# Altium PCB AI_Watch_PCB.PcbDoc (part 2 of 3)
Units mm, origin at the board's own origin, x right, y up, seen from the top; angles counter-clockwise.
Board outline 25 x 31 mm, 4 copper layers (Top Layer, Ground, Power, Bottom Layer), stack 1.586 mm thick; 87 components, 63 nets, 302 pads, 164 vias.
Unrouted connection lines stored in the file: 13.
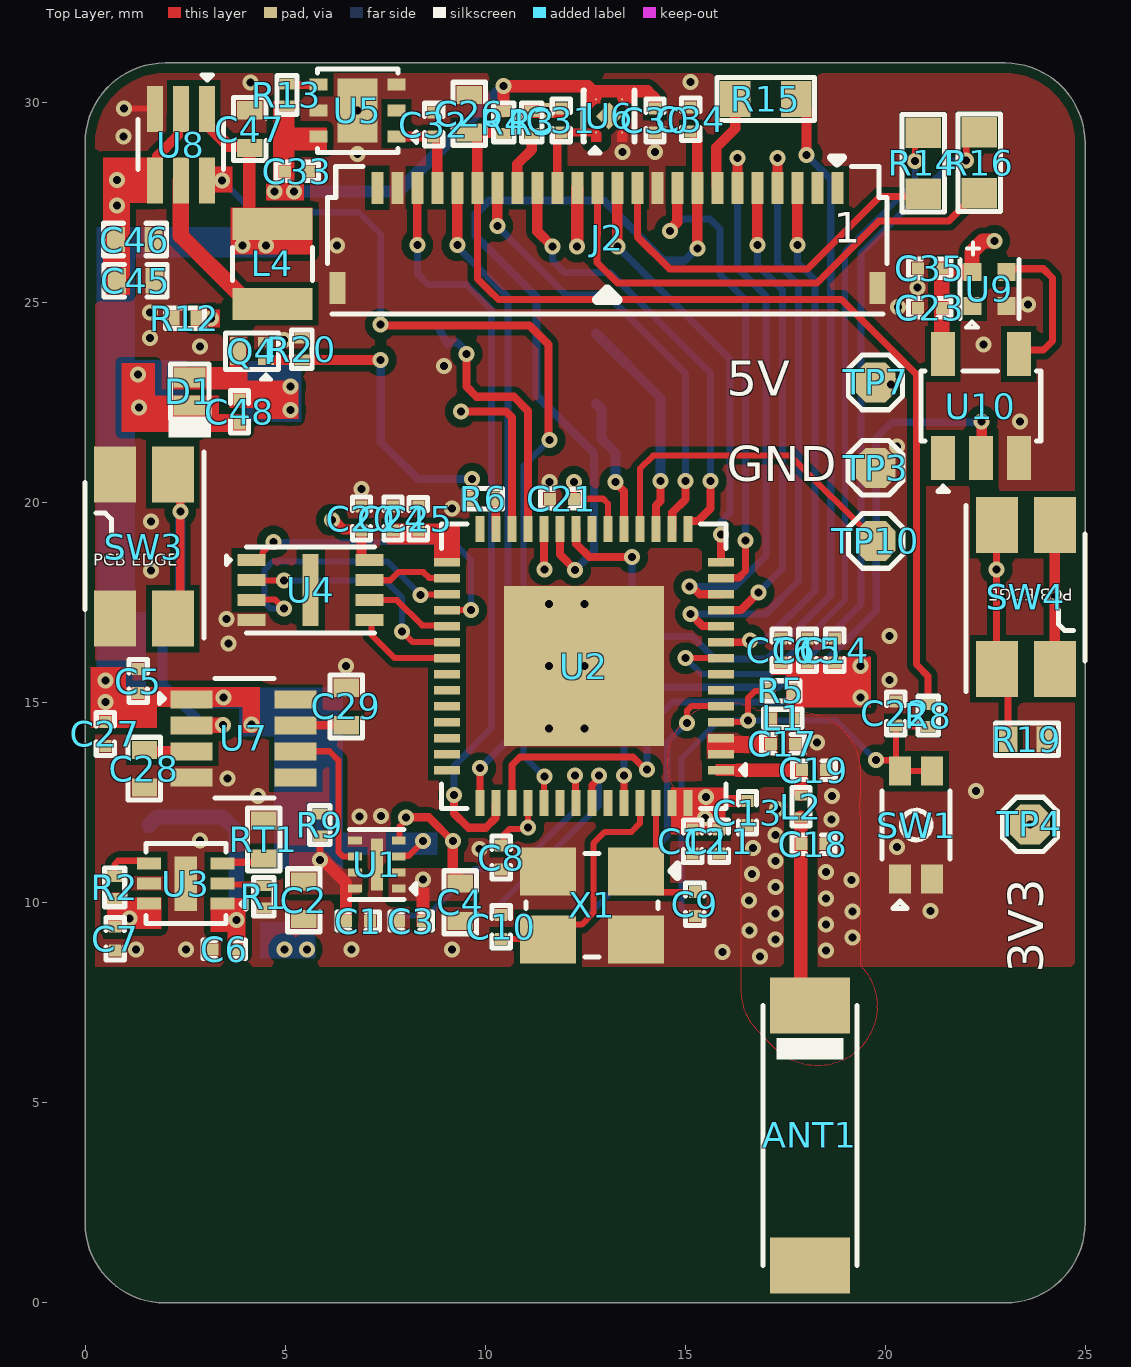
[diagram p0: Top Layer view]

## Part data (continued)
SW3 SW4: "SWITCH TACTILE SPST-NO 0.05A 12V", Actuator Color=Black, Case/Package=SMD/SMT, Contact Current Rating=50mA, Contact Resistance=500mR, LCSC Part Number=C79167, Manufacturer=Panasonic, Max Operating Temperature=70°C, Max Voltage Rating (DC)=12V, Min Operating Temperature=-20°C, Operating Force=2.2N, Package Quantity=5000, Supplier Part Number=667-EVQP7A01P, Actuator Length=0.65mm, Category="Tactile Switches", ComponentLink1Description=http://uk.rs-online.com/webdocs/13a5/0900766b813a5dbe.pdf?src-supplier=Rs, ComponentLink1URL=http://uk.rs-online.com/webdocs/13a5/0900766b813a5dbe.pdf?src-supplier=Rs, ComponentLink2Description=http://datasheet.octopart.com/EVQ-P7A01P-Panasonic-datasheet-98950114.pdf?src-supplier=Rs, ComponentLink2URL=http://datasheet.octopart.com/EVQ-P7A01P-Panasonic-datasheet-98950114.pdf?src-supplier=Rs, ComponentLink3Description=https://www3.panasonic.biz/ac/e_download/control/switch/light-touch/catalog/sw_lt_eng_3529s_side.pdf?src-supplier=Verical, ComponentLink3URL=https://www3.panasonic.biz/ac/e_download/control/switch/light-touch/catalog/sw_lt_eng_3529s_side.pdf?src-supplier=Verical, ComponentLink4Description=https://www3.panasonic.biz/ac/e_download/control/switch/light-touch/catalog/sw_lt_eng_3529s_side.pdf?src-supplier=Onlinecomponents.com, ComponentLink4URL=https://www3.panasonic.biz/ac/e_download/control/switch/light-touch/catalog/sw_lt_eng_3529s_side.pdf?src-supplier=Onlinecomponents.com, ComponentLink5Description=https://www3.panasonic.biz/ac/e_download/control/switch/light-touch/catalog/sw_lt_eng_3529s_side.pdf?src-supplier=Arrow+Electronics, ComponentLink5URL=https://www3.panasonic.biz/ac/e_download/control/switch/light-touch/catalog/sw_lt_eng_3529s_side.pdf?src-supplier=Arrow+Electronics, ComponentLink6Description=https://www3.panasonic.biz/ac/e_download/control/switch/light-touch/catalog/sw_lt_eng_3529s_side.pdf?src-supplier=Avnet, ComponentLink6URL=https://www3.panasonic.biz/ac/e_download/control/switch/light-touch/catalog/sw_lt_eng_3529s_side.pdf?src-supplier=Avnet, ComponentLink7Description=http://www.farnell.com/datasheets/1790605.pdf?src-supplier=Newark, ComponentLink7URL=http://www.farnell.com/datasheets/1790605.pdf?src-supplier=Newark, ComponentLink8Description=https://datasheet.octopart.com/EVQ-P7A01P-Panasonic-datasheet-98950114.pdf?src-supplier=Future+Electronics, ComponentLink8URL=https://datasheet.octopart.com/EVQ-P7A01P-Panasonic-datasheet-98950114.pdf?src-supplier=Future+Electronics, ComponentLink9Description=https://www3.panasonic.biz/ac/e_download/control/switch/light-touch/catalog/sw_lt_eng_3529s_side.pdf?src-supplier=Mouser, ComponentLink9URL=https://www3.panasonic.biz/ac/e_download/control/switch/light-touch/catalog/sw_lt_eng_3529s_side.pdf?src-supplier=Mouser, ComponentLink10Description=https://www3.panasonic.biz/ac/e_download/control/switch/light-touch/catalog/sw_lt_eng_3529s_side.pdf?src-supplier=Allied+Electronics, ComponentLink10URL=https://www3.panasonic.biz/ac/e_download/control/switch/light-touch/catalog/sw_lt_eng_3529s_side.pdf?src-supplier=Allied+Electronics, ComponentLink11Description=http://datasheet.octopart.com/EVQ-P7A01P-Panasonic-datasheet-98950114.pdf?src-supplier=Future+Electronics, ComponentLink11URL=http://datasheet.octopart.com/EVQ-P7A01P-Panasonic-datasheet-98950114.pdf?src-supplier=Future+Electronics, ComponentLink12Description=http://datasheet.octopart.com/EVQ-P7A01P-Panasonic-datasheet-98950114.pdf?src-supplier=Distrelec, ComponentLink12URL=http://datasheet.octopart.com/EVQ-P7A01P-Panasonic-datasheet-98950114.pdf?src-supplier=Distrelec, ComponentLink13Description=http://datasheet.octopart.com/EVQ-P7A01P-Panasonic-datasheet-98950114.pdf?src-supplier=Farnell, ComponentLink13URL=http://datasheet.octopart.com/EVQ-P7A01P-Panasonic-datasheet-98950114.pdf?src-supplier=Farnell, ComponentLink14Description=http://www.farnell.com/datasheets/1790605.pdf?src-supplier=Element14, ComponentLink14URL=http://www.farnell.com/datasheets/1790605.pdf?src-supplier=Element14, ComponentLink15Description=http://industrial.panasonic.com/www-data/pdf/ATK0000/ATK0000CE20.pdf?src-supplier=Farnell, ComponentLink15URL=http://industrial.panasonic.com/www-data/pdf/ATK0000/ATK0000CE20.pdf?src-supplier=Farnell, ComponentLink16Description=http://datasheet.octopart.com/EVQ-P7A01P-Panasonic-datasheet-98950114.pdf?src-supplier=Newark, ComponentLink16URL=http://datasheet.octopart.com/EVQ-P7A01P-Panasonic-datasheet-98950114.pdf?src-supplier=Newark, ComponentLink17Description=https://datasheet.octopart.com/EVQ-P7A01P-Panasonic-datasheet-22087671.pdf?src-supplier=Electro+Sonic, ComponentLink17URL=https://datasheet.octopart.com/EVQ-P7A01P-Panasonic-datasheet-22087671.pdf?src-supplier=Electro+Sonic, ComponentLink18Description=http://datasheet.octopart.com/EVQ-P7A01P-Panasonic-datasheet-98950114.pdf?src-supplier=Quest, ComponentLink18URL=http://datasheet.octopart.com/EVQ-P7A01P-Panasonic-datasheet-98950114.pdf?src-supplier=Quest, ComponentLink19Description=https://www3.panasonic.biz/ac/e_download/control/switch/light-touch/catalog/sw_lt_eng_3529s_side.pdf?src-supplier=TTI, ComponentLink19URL=https://www3.panasonic.biz/ac/e_download/control/switch/light-touch/catalog/sw_lt_eng_3529s_side.pdf?src-supplier=TTI, ComponentLink20Description=https://www3.panasonic.biz/ac/e_download/control/switch/light-touch/catalog/sw_lt_eng_3529s_side.pdf?src-supplier=NAC+Semi, ComponentLink20URL=https://www3.panasonic.biz/ac/e_download/control/switch/light-touch/catalog/sw_lt_eng_3529s_side.pdf?src-supplier=NAC+Semi, Electrical Life=100000Cycles, Illumination Type=Non-Illuminated, Item Type="Tactile Switch", Lead Free="Lead Free", Manufacturer Part Number=EVQ-P7A01P, Mechanical Life=100000Cycles, Mounting Technology="Surface Mount", Orientation="Right Angle", Packaging="Tape and Reel", Pricing="1=0.28, 10=0.258, 50=0.258, 100=0.213, 1000=0.169, 10000=0.133 (USD)", Radiation Hardening=No, Reach SVHC Compliant=Unknown, RoHS=Yes, Series=EVQP7, Stock=47904, Supplier=Mouser, Switch Function=Off-Mom, Switch Travel=0.2mm, Termination="Gull Wing", Throw Configuration=SPST
TP1 TP2 TP5 TP6: "Wire Connecting Pad", Item Type="Test Point", Manufacturer Part Number="2 Test Pad"
TP3 TP4 TP7 TP9 TP10 TP11: "Test Point ON", Item Type="Test Point", Manufacturer Part Number="TEST POINT 0.5mm Dia"
U1: "IC REG LINEAR 3.3V 1A 8DFN", Case/Package=DFN, LCSC Part Number=C2969937, Manufacturer=STMicroelectronics, Max Operating Temperature=85°C, Max Supply Voltage=5.5V, Min Operating Temperature=-40°C, Min Output Voltage=3.3V, Output Current=1A, Power Supply Rejection Ratio (PSRR)=55dB, Quiescent Current=155uA, ComponentLink1Description=https://www.st.com/resource/en/datasheet/ld56100.pdf?src-supplier=Digikey, ComponentLink1URL=https://www.st.com/resource/en/datasheet/ld56100.pdf?src-supplier=Digikey, Item Type=IC, Manufacturer Part Number=LD56100DPU33R, Mounting Technology="Surface Mount", Number of Regulators=1, Output Configuration=Positive, Output Type=Fixed, Packaging="Cut Tape", Pricing="1=1.23, 10=0.751, 50=0.751, 100=0.479, 1000=0.326, 10000=0.229 (USD)", RoHS=Yes, RoHS Compliant=Yes, Series=-, Supplier=Mouser
U2: "SMD IC ESP32-S3R8, DUAL-CORE MCU", Manufacturer="Espressif Systems", Supplier Part Number 1=356-ESP32-S3R8, Category="RF Receivers, Transceivers", Item Type=IC, Manufacturer Part Number=ESP32-S3R8, Pricing 1="1=2.46, 10=2.46, 50=2.46, 100=2.46, 1000=2.46, 10000=2.46 (USD)", RoHS=No, Stock 1=2366, Supplier 1=Mouser
U3: "500Ma Usb Compatible Single Cell Li-Ion Linear Charger With Float Voltage Of 4.2V / Reel", Battery Pack Voltage=4.5V, Case/Package=DFN, LCSC Part Number=C890816, Manufacturer="ON Semiconductor", Max Charge Current=500mA, Max Operating Temperature=85°C, Max Supply Voltage=6V, Min Operating Temperature=-30°C, ComponentLink1Description=LCSC, ComponentLink1URL=https://www.lcsc.com/product-detail/Battery-Management-ICs_onsemi-FAN54120MP420X_C890816.html, Fault Protection="Over Current,Over Voltage,Short Circuit", Interface=USB, Item Type=IC, Manufacturer Part Number=FAN54120MP420X, Mounting Technology="Surface Mount", Number of Cells=1, Pricing="3000=0.9606, 6000=0.9252, 12000=0.8029, 15000=0.7598, 24000=0.7093, 30000=0.6852 (USD)", RoHS=Yes, RoHS Compliant=Yes, Series=-, Stock=3000, Supplier="Arrow Electronics", Supplier Part Number=FAN54120MP420X
U4: "IC FLASH 16MBIT SPI/QUAD 8USON", LCSC Part Number=C2986331, Manufacturer=GigaDevice, Item Type=IC, Manufacturer Part Number=GD25Q16EEIGR, Pricing="1=0.84, 10=0.75, 25=0.7152, 50=0.69, 100=0.6658, 250=0.63504, 500=0.61266, 1000=0.59108 (USD)", RoHS=No, Stock=2468, Supplier=Digikey
U5: "IC REG LINEAR 2.8V 150MA 6-WSON", LCSC Part Number=C2876267, Manufacturer="Texas Instruments", ComponentLink1Description=https://datasheet.ciiva.com/41462/001015109-da-01-en-ic-reg-ldo-2-8v-tps78228drvr-wson-6-tid-41462955.pdf?src-supplier=Conrad, ComponentLink1URL=https://datasheet.ciiva.com/41462/001015109-da-01-en-ic-reg-ldo-2-8v-tps78228drvr-wson-6-tid-41462955.pdf?src-supplier=Conrad, ComponentLink2Description=https://datasheet.ciiva.com/2052/tps782-2052513.pdf?src-supplier=Digikey, ComponentLink2URL=https://datasheet.ciiva.com/2052/tps782-2052513.pdf?src-supplier=Digikey, ComponentLink3Description=https://datasheet.ciiva.com/2052/tps782-2052514.pdf?src-supplier=Digikey, ComponentLink3URL=https://datasheet.ciiva.com/2052/tps782-2052514.pdf?src-supplier=Digikey, ComponentLink4Description=https://datasheet.ciiva.com/2052/tps782-2052515.pdf?src-supplier=Digikey, ComponentLink4URL=https://datasheet.ciiva.com/2052/tps782-2052515.pdf?src-supplier=Digikey, Item Type=IC, Manufacturer Part Number=TPS78228DRVR, Pricing="1=0.8, 10=0.574, 50=0.516, 100=0.453, 1000=0.39, 10000=0.303 (USD)", RoHS=Yes, Stock=2455, Supplier=Mouser
U6: "IC REG LIN 1.2V 150MA USPQ-4B04", LCSC Part Number=C216662, Manufacturer=Torex, ComponentLink1Description=https://www.torexsemi.com/file/xc6504/XC6504.pdf?src-supplier=Digikey, ComponentLink1URL=https://www.torexsemi.com/file/xc6504/XC6504.pdf?src-supplier=Digikey, Item Type=IC, Manufacturer Part Number=XC6504A1219R-G, Pricing="1=0.74, 10=0.456, 25=0.38, 100=0.2939, 250=0.25156, 500=0.22552, 1000=0.20381 (USD)", RoHS=No, Stock=3000, Supplier=Digikey
U7: "IC PB ON/OFF CONTROLLER TSOT23-8", Case/Package=SOT-23-8, LCSC Part Number=C462646, Manufacturer="Analog Devices / Linear Technology", Max Operating Temperature=70°C, Min Operating Temperature=0°C, Operating Supply Current=6uA, Package Quantity=2500, ComponentLink1Description=https://datasheet.ciiva.com/1967/7377-1967611.pdf?src-supplier=Digikey, ComponentLink1URL=https://datasheet.ciiva.com/1967/7377-1967611.pdf?src-supplier=Digikey, Item Type=IC, Length=2.9mm, Manufacturer Part Number=LTC2950CTS8-2#TRPBF, Packaging="Tape and Reel", Pins=8, Pricing="2500=2.7375 (USD)", RoHS=Yes, RoHS Compliant=Yes, Supplier=Digikey
U8: "IC REG BOOST 5V 200MA SC70-6", LCSC Part Number=C116461, Manufacturer="Texas Instruments", ComponentLink1Description=https://datasheet.ciiva.com/2034/tps61220-2034085.pdf?src-supplier=Digikey, ComponentLink1URL=https://datasheet.ciiva.com/2034/tps61220-2034085.pdf?src-supplier=Digikey, ComponentLink2Description=https://datasheet.ciiva.com/14376/tps61222-14376997.pdf?src-supplier=Avnet, ComponentLink2URL=https://datasheet.ciiva.com/14376/tps61222-14376997.pdf?src-supplier=Avnet, Item Type=IC, Manufacturer Part Number=TPS61222DCKR, Pricing="1=1.08, 10=0.78, 50=0.705, 100=0.622, 1000=0.515, 10000=0.476 (USD)", RoHS=Yes, Stock=20831, Supplier=Mouser
U9: "Colorless transparence -40℃~+150℃ 正贴 RGB 120° 1010 Light Emitting Diodes (LED) ROHS", LCSC Part Number=C5349953, Manufacturer=XINGLIGHT, Package=1010, ComponentLink1Description=LCSC, ComponentLink1URL=https://www.lcsc.com/product-detail/span-style-background-color-ff0-RGB-span-LEDs-Built-in-IC_XINGLIGHT-XL-1010RGBC-WS2812B_C5349953.html, Item Type="RGB LED", Manufacturer Part Number=XL-1010RGBC-WS2812B
U10: "IC BUF NON-INVERT 5.5V SOT23-5", Case/Package=SOT-23-5, High Level Output Current=-8mA, LCSC Part Number=C100024, Low Level Output Current=8mA, Manufacturer="Texas Instruments", Max Operating Temperature=125°C, Max Supply Voltage=5.5V, Min Operating Temperature=-40°C, Min Supply Voltage=1.6V, Package Quantity=3000, Quiescent Current=1uA, Supplier Part Number 1=296-37176-6-ND, ComponentLink1Description=http://www.ti.com/lit/pdf/sdyu001?src-supplier=Digi-Key, ComponentLink1URL=http://www.ti.com/lit/pdf/sdyu001?src-supplier=Digi-Key, ComponentLink2Description=http://www.ti.com/lit/ds/symlink/sn74lv1t34.pdf?src-supplier=Avnet, ComponentLink2URL=http://www.ti.com/lit/ds/symlink/sn74lv1t34.pdf?src-supplier=Avnet, Item Type=IC, Lead Free="Lead Free", Logic Function=Buffer,Inverting, Manufacturer Part Number=SN74LV1T34DBVR, Mount="Surface Mount", Number of Bits=1, Number of Bits per Element=1, Number of Channels=1, Number of Elements=1, Number of Input Lines=1, Number of Inputs=1, Number of Output Lines=1, Number of Outputs=1, Number of Pins=5, Operating Supply Current=8mA, Packaging="Tape and Reel", Polarity=Non-Inverting, Pricing 1="1=0.43, 10=0.349, 25=0.3192, 100=0.2374, 250=0.2152, 500=0.17808, 1000=0.13356 (USD)", Propagation Delay=15.5ns, Radiation Hardening=No, REACH SVHC="No SVHC", RoHS Compliant=Yes, Stock 1=37360, Supplier 1=Digi-Key, Weight=0.000353oz
X1: library part X322540MPB4SI, "40MHz SMD Crystal Resonator 15pF SMD3225-4P Crystals ROHS", LCSC Part Number=C9010, Manufacturer="Yangxing Tech", ComponentLink1Description=LCSC, ComponentLink1URL=https://www.lcsc.com/product-detail/Crystals_Yangxing-Tech-X322540MPB4SI_C9010.html, Item Type=Crystal, Manufacturer Part Number=X322540MPB4SI

## Via types
v1: diameter 0.4, hole 0.2, Top Layer to Bottom Layer, tented both sides, 146 vias
v2: diameter 0.4, hole 0.2, Top Layer to Bottom Layer, 18 vias

## Nets (pads, with @x,y where several pads share a name; then routed paths per layer and width w, separated by ;. In a path a pad name is that pad's centre, name@x,y a point inside that pad or via, vN(x,y) a via of type N, cw(c..) or ccw(c..) an arc to the next point about the centre after c; other vN are vias at no path point)
3V3: C3.2 C4.2 C8.2 C11.2 C12.2 C13.2 C14.2 C15.2 C16.2 C20.2 C21.2 C30.2 C33.2 J1.2 J2.14 L1.1 R4.2 R5.2 R13.2 SW4.2 TP4.1 U1.1 U1.2 U1.4 U2.20 U2.46 U2.55 U2.56 U4.8 U5.6 U6.3 U6.4 | length 28.4
  Top Layer w0.152: U1.4@7.907,11.551 7.894,11.551 7.864,11.581 7.864,11.912 8.026,12.074 v1(8.026,12.141) ; C8.2@10.401,11.436 10.457,11.492 10.457,11.698 10.607,11.847 11.034,11.847 v1(11.074,11.887) ; U2.46@11.071,12.492 U2.46@11.071,12.494 11.073,12.492 v1@11.073,11.889 ; v1(12.217,20.523) 12.219,20.521 12.219,20.107 C21.2@12.221,20.105 12.953,20.105 13.071,19.986 U2.20@13.071,19.344
  Top Layer w0.203: v1(8.026,12.141) 8.594,12.141 v1(9.192,11.543)
  Top Layer w0.254: v1(6.173,19.578) 6.213,19.578 6.458,19.333 6.886,19.333 6.907,19.312 6.907,18.592 6.93,18.569 U4.8@7.112,18.569 ; v1(9.192,11.543) 9.192,10.825 9.338,10.678 9.338,10.589 9.44,10.488 C4.2@9.529,10.488 ; C13.2@16.462,12.529 C13.2@16.485,12.552 ; R5.2@17.664,15.179 17.664,15.747 17.734,15.818 18.334,15.818 ; 17.695,15.067 18.051,15.423 ; L1.1@17.72,14.614 17.72,15.014 17.756,15.05 17.771,15.05 ; 18.156,15.014 18.565,15.423 18.586,15.423 ; SW4.2@23.864,19.453 24.242,19.075 24.242,16.177 SW4.2@23.98,15.915
  Top Layer w0.305: R4.2@10.464,29.787 10.464,30.4 v1@10.482,30.418 ; v1(10.464,30.419) 12.571,30.419 12.698,30.292 14.053,30.292 14.249,30.096 C30.2@14.249,29.863 ; v1(12.303,26.413) 12.303,27.876 J2.14@12.306,27.879
  Bottom Layer w0.305: v1(4.735,27.788) v1(5.217,27.788) 7.832,27.788 v1(10.464,30.419)
  other v1: 4.988,8.839 5.543,8.839 8.451,10.592 23.622,11.963 15.503,12.123 15.517,12.649 19.38,15.138 19.38,15.926 24.242,17.66
5V_BOOST: C23.2 C35.1 C45.2 C46.1 TP7.1 U8.2 U8.4 U9.2 U10.5 | length 6
  Top Layer w0.254: U8.4@1.794,28.067 1.803,28.076 1.803,28.668 2.32,29.185 2.32,29.672 U8.2@2.422,29.774
  Top Layer w0.381: U10.5@21.418,23.748 C35.1@21.418,25.865 ; C35.1@21.473,25.796 21.495,25.774 U9.2@22.181,25.774 22.174,25.781 22.174,26.277 22.445,26.547 22.727,26.547 v1(22.73,26.551)
  other v1: 20.142,22.962 0.802,27.431 0.799,28.071
5VBOOST_EN: R12.2 U2.47 U8.6 | length 27.4
  Top Layer w0.152: R12.2@2.844,24.697 2.909,24.632 3.103,24.632 v1@3.15,24.585 ; U2.47@11.471,12.494 11.476,12.499 11.476,13.153 v1(11.481,13.157)
  Top Layer w0.203: U8.6@3.145,28.067 3.494,28.067 v1@3.498,28.062 ; v1(7.391,24.46) 7.413,24.439 11.109,24.439 11.583,23.964 v1@11.583,21.573
  Power w0.152: v1@3.133,24.602 3.133,27.774 v1(3.422,28.062)
  Bottom Layer w0.152: v1(3.422,28.062) 4.216,27.269 6.843,27.269 7.391,26.721 v1(7.391,24.46) ; v1(11.481,13.157) 10.957,13.681 10.957,20.922 v1(11.608,21.573)
  other v1: 3.15,24.617
CHRG_PWR: C6.2 TP1.2 U3.1 | length 4.6
  Bottom Layer w0.381: TP1.2@1.597,11.945 1.803,12.151 3.44,12.151 3.779,11.811 v1(3.779,9.572)
CSI_1V2: C31.2 J2.15 U6.1 | length 2.3
  Top Layer w0.203: J2.15@11.806,27.879 11.806,28.177 11.806,29.015 cw(c12.156,29.015) 11.868,29.215 C31.2@11.908,29.263 11.911,29.261 U6.1@12.776,29.261